# Altium PCB PCB1.PcbDoc (part 2 of 2)
Units mm, origin at the board's own origin, x right, y up, seen from the top; angles counter-clockwise.
Board outline 126 x 133 mm, 6 copper layers (Top Layer, GND Layer, Signal Layer 1, Signal Layer 2, VCC Layer, Bottom Layer), stack 0.887 mm thick; 217 components, 126 nets, 563 pads, 129 vias.
Unrouted connection lines stored in the file: 18.
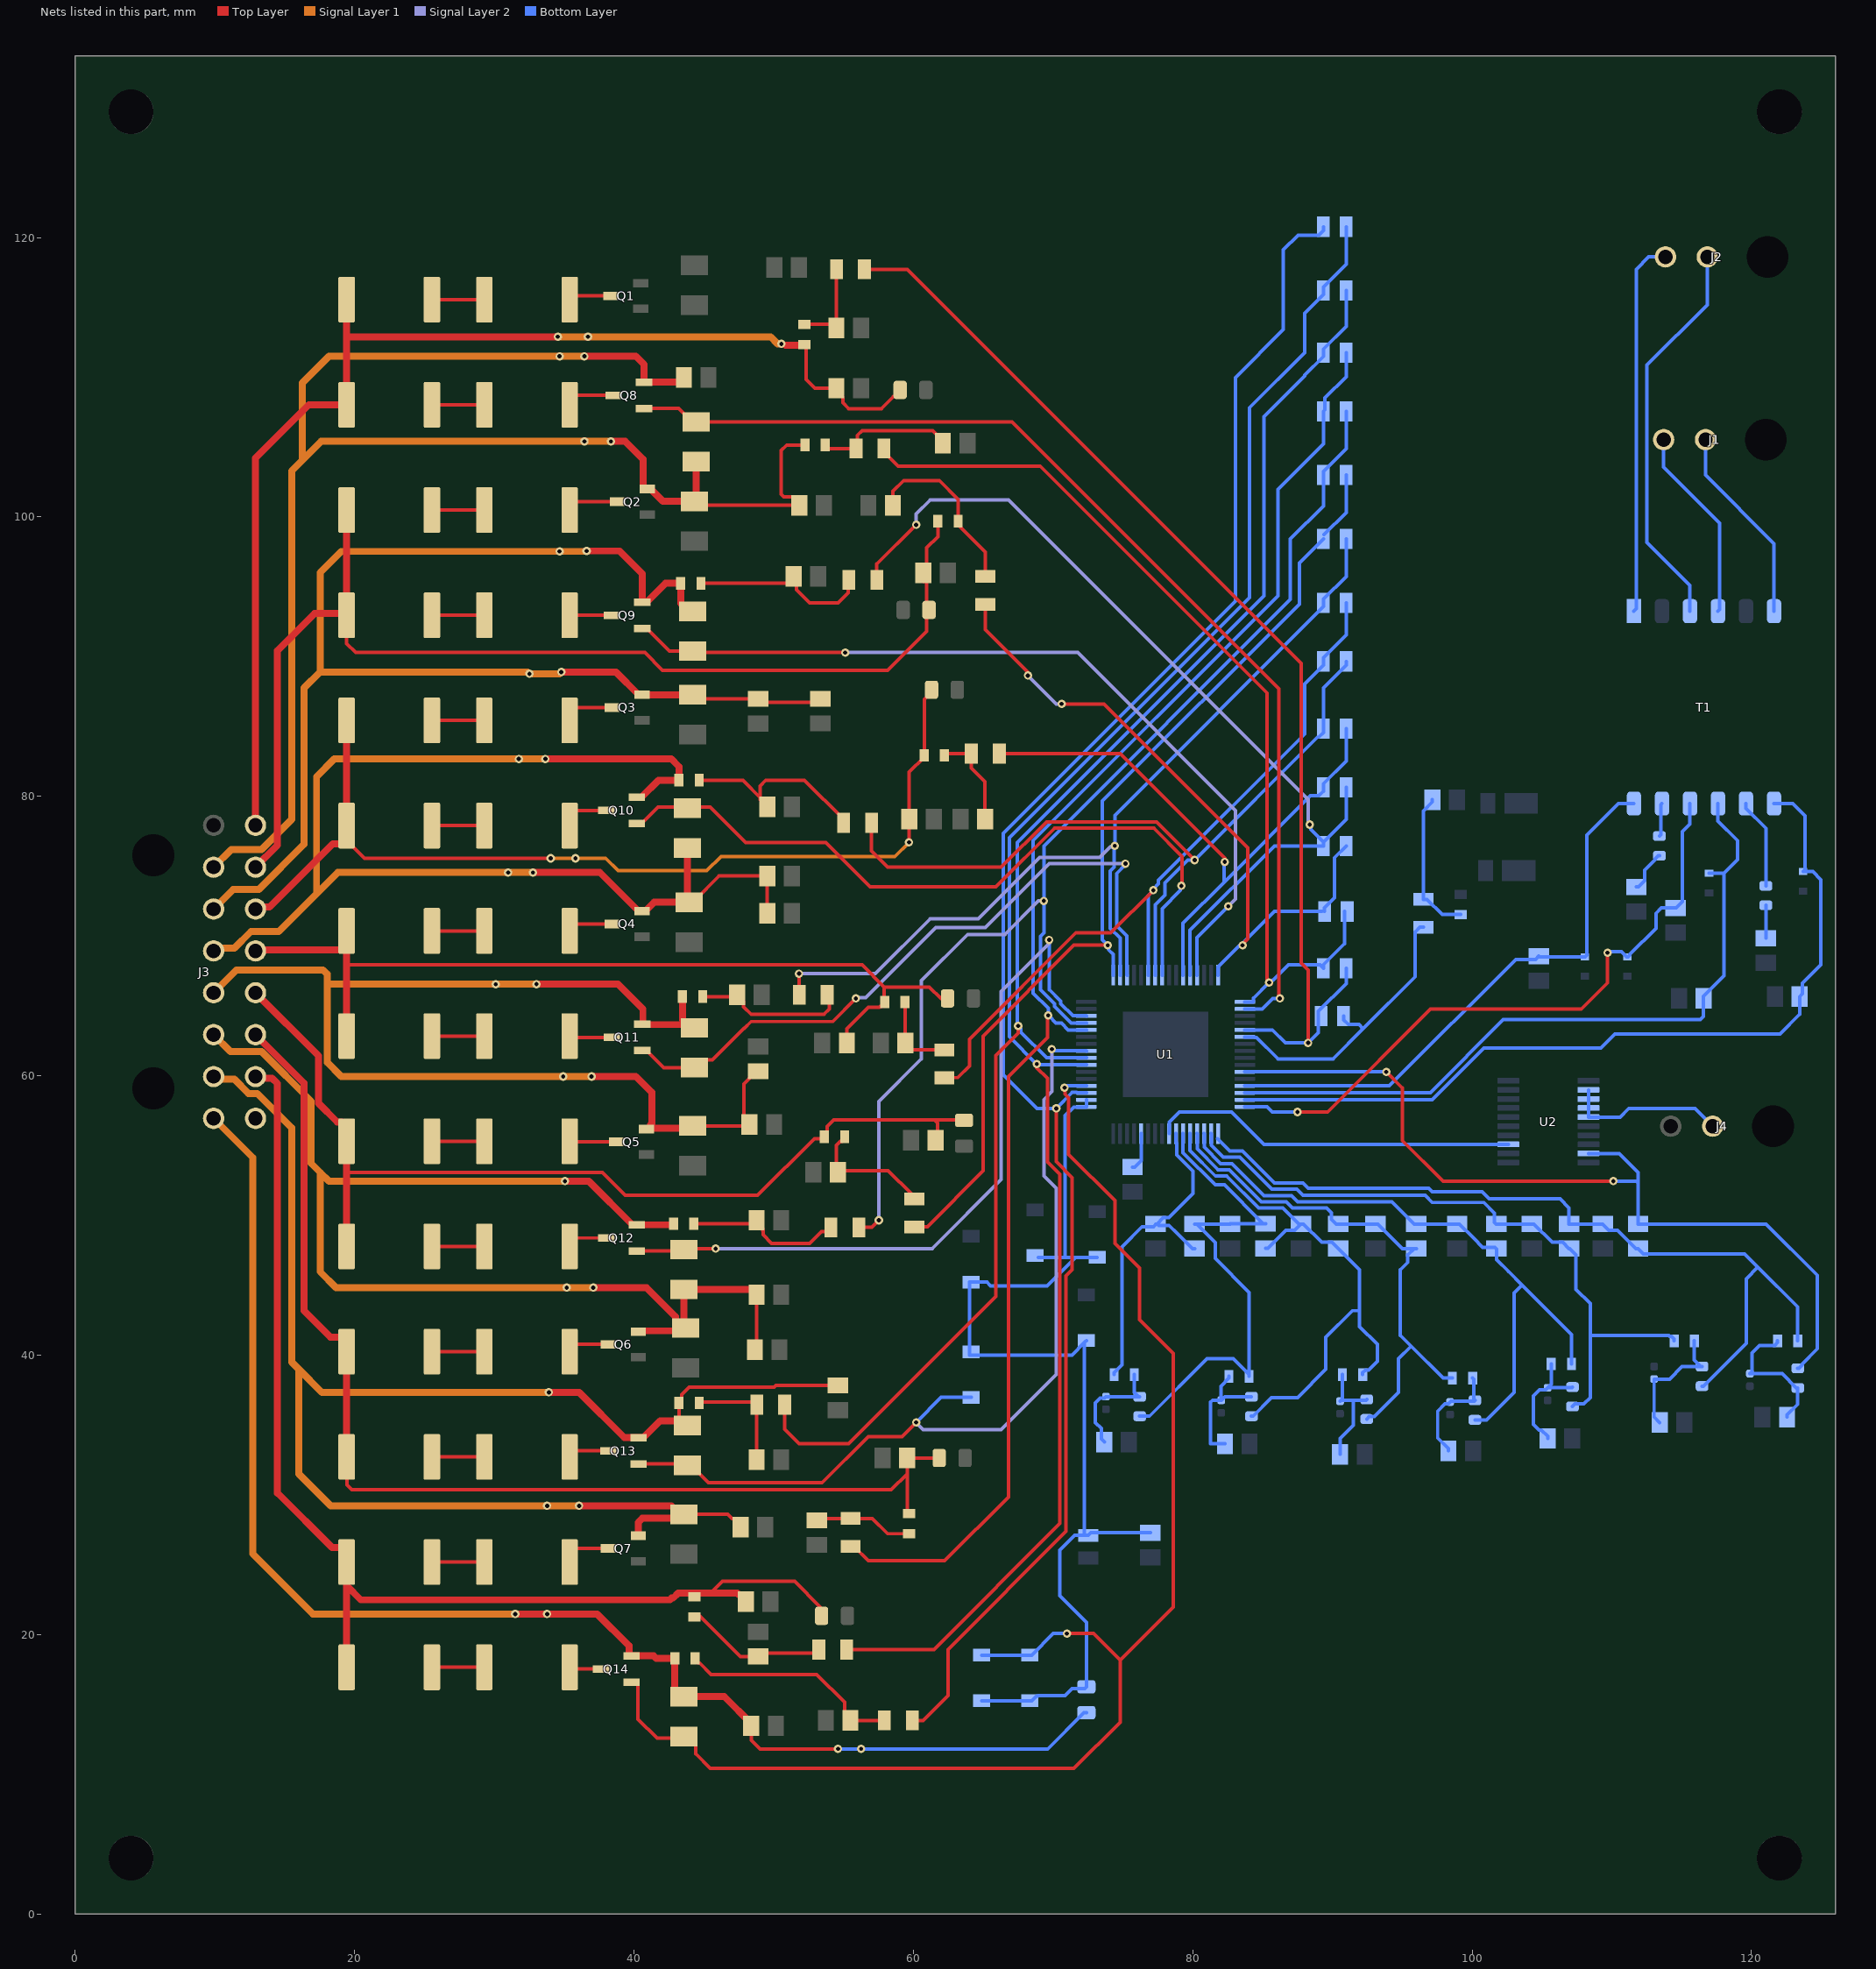
[diagram p6: the nets of this part, all layers, seen from the top]

## Via types
v1: diameter 0.6, hole 0.3, Top Layer to Bottom Layer, 129 vias

## Nets (pads, with @x,y where several pads share a name; then routed paths per layer and width w, separated by ;. In a path a pad name is that pad's centre, name@x,y a point inside that pad or via, vN(x,y) a via of type N, cw(c..) or ccw(c..) an arc to the next point about the centre after c; other vN are vias at no path point) (continued)
CB_TOP1: D6.2 D9.2 Q14.1 R97.2 U1.4 | length 104.1
  Top Layer w0.25: Q14.1@39.827,16.586 40.145,16.586 40.286,16.445 40.286,13.943 41.656,12.573 43.434,12.573 R97.2@43.561,12.7 43.836,12.7 44.411,12.125 44.411,11.469 45.466,10.414 71.501,10.414 74.803,13.716 74.803,18.161 ; v1(70.821,59.146) 70.866,59.101 70.866,58.674 71.12,58.42 71.12,54.356 74.422,51.054 74.422,48.006 76.2,46.228 76.2,42.545 78.613,40.132 78.613,21.971 74.803,18.161 ; v1(70.993,20.066) 72.898,20.066 74.803,18.161
  Bottom Layer w0.25: D9.2@64.897,18.526 D6.2@68.326,18.526 68.481,18.526 70.021,20.066 v1(70.993,20.066) ; v1(70.821,59.146) 70.974,59.299 72.369,59.299 U1.4@72.39,59.278
CB_TOP2: D11.2 Q13.1 R86.2 U1.9 | length 65.2
  Top Layer w0.25: Q13.1@40.335,32.207 43.711,32.207 R86.2@43.815,32.103 44.09,32.103 45.332,30.861 53.467,30.861 56.769,34.163 59.182,34.163 v1(60.198,35.179)
  Signal Layer 2 w0.25: v1(60.198,35.179) 60.706,34.671 66.294,34.671 70.231,38.608 70.231,51.943 69.342,52.832 69.342,58.288 69.927,58.873 69.927,61.894 v1(69.912,61.909)
  Bottom Layer w0.25: v1(60.198,35.179) 61.992,36.973 D11.2@64.135,36.973 ; v1(69.912,61.909) 70.028,61.793 72.375,61.793 U1.9@72.39,61.778
CB_TOP3: Q12.1 R75.2 U1.14 | length 53.9
  Top Layer w0.25: Q12.1@40.208,47.447 43.454,47.447 R75.2@43.561,47.554 43.632,47.625 v1(45.847,47.625)
  Signal Layer 2 w0.25: v1(45.847,47.625) 61.341,47.625 66.294,52.578 66.294,66.04 69.723,69.469 v1(69.723,69.723)
  Bottom Layer w0.25: v1(69.723,69.723) 69.723,66.17 70.557,65.336 70.557,65.161 71.424,64.293 72.375,64.293 U1.14@72.39,64.278
CB_TOP4: Q11.1 R64.2 U1.19 | length 49.7
  Top Layer w0.25: Q11.1@40.589,61.798 40.907,61.798 42.126,60.579 R64.2@44.323,60.579 44.889,61.145 45.619,61.145 47.86,63.385 47.891,63.385 48.387,63.881 54.229,63.881 v1(55.88,65.532)
  Signal Layer 2 w0.25: v1(55.88,65.532) 55.947,65.599 56.582,65.599 61.595,70.612 65.151,70.612 69.723,75.184 v1(75.184,75.184)
  Bottom Layer w0.25: v1(75.184,75.184) 75.184,75.117 74.549,74.482 74.549,70.74 75.275,70.014 75.275,67.911 75.295,67.891 75.295,67.213 U1.19@75.31,67.198
CB_TOP5: Q10.1 R53.2 U1.24 | length 53.6
  Top Layer w0.25: Q10.1@40.208,78.054 40.526,78.054 41.719,79.248 43.815,79.248 45.466,79.248 48.006,76.708 53.721,76.708 56.896,73.533 65.913,73.533 70.094,77.714 77.226,77.714 79.248,75.692 79.248,73.655 v1(79.187,73.594)
  Bottom Layer w0.25: U1.24@77.81,67.198 77.81,71.968 79.12,73.278 79.12,73.527 v1(79.187,73.594)
CB_TOP6: Q9.1 R42.2 U1.29 | length 60.8
  Top Layer w0.25: Q9.1@40.589,92.024 40.907,92.024 42.535,90.396 R42.2@44.196,90.396 44.295,90.297 v1(55.118,90.297)
  Signal Layer 2 w0.25: v1(55.118,90.297) 71.755,90.297 83.058,78.994 83.058,72.644 v1(82.55,72.136)
  Bottom Layer w0.25: U1.29@80.31,67.198 80.31,69.896 v1(82.55,72.136)
CB_TOP7: Q8.1 R31.2 U1.34 | length 78.8
  Top Layer w0.25: Q8.1@40.716,107.772 43.21,107.772 44.175,106.807 R31.2@44.45,106.807 67.056,106.807 86.174,87.689 86.174,65.591 v1(86.233,65.532)
  Bottom Layer w0.25: U1.34@83.73,64.778 84.971,64.778 85.725,65.532 v1(86.233,65.532)
CELL_IN_BOT2: C46.1 C55.1 J3.7 pad.2 Q2.2 Q8.2 R28.1 R31.1 R48.1 | length 117.4
  Top Layer w0.25: R48.1@44.323,101.12 44.605,100.838 C55.1@51.834,100.838 51.834,100.998 51.384,101.448 50.717,101.448 50.546,101.619 50.546,104.775 50.927,105.156 R28.1@52.234,105.156
  Top Layer w0.5: J3.7@9.906,74.93 J3.7@10.102,75.126 ; v1(36.449,111.506) 40.132,111.506 40.716,110.922 Q8.2@40.716,109.652 43.245,109.652 43.57,109.977 C46.1@43.57,109.982 ; v1(38.354,105.41) 39.37,105.41 40.653,104.127 40.653,102.062 40.708,102.007 41.188,102.007 42.075,101.12 R48.1@44.323,101.12 44.45,101.247 R31.1@44.45,103.957
  Signal Layer 1 w0.5: J3.7@9.906,74.93 11.176,76.2 13.335,76.2 15.494,78.359 15.494,103.301 16.256,104.063 ; v1(36.449,111.506) v1(34.671,111.506) 18.161,111.506 16.256,109.601 16.256,104.063 ; v1(38.354,105.41) pad.2@36.449,105.41 17.603,105.41 16.256,104.063
CELL_IN_BOT3: C51.1 C60.1 J3.6 Q3.2 Q9.2 R39.1 R42.1 R59.1 | length 97.5
  Top Layer w0.25: R59.1@44.196,87.277 44.494,86.977 C51.1@48.895,86.977 49.14,86.732 C60.1@53.467,86.732
  Top Layer w0.5: v1(34.798,88.9) 38.702,88.9 40.327,87.275 Q3.2@40.567,87.275 40.568,87.276 R59.1@44.196,87.277 ; v1(36.608,97.568) 38.957,97.568 40.589,95.936 Q9.2@40.589,93.904 40.907,93.904 42.253,95.25 R39.1@43.344,95.25 43.344,93.823 43.921,93.246 R42.1@44.196,93.246
  Signal Layer 1 w0.5: J3.6@9.906,71.933 11.312,73.339 13.141,73.339 16.383,76.581 16.383,87.757 17.526,88.9 ; v1(34.798,88.9) 34.671,88.773 v1(32.512,88.773) 32.385,88.9 17.526,88.9 ; v1(36.608,97.568) 36.576,97.536 v1(34.671,97.536) 19.05,97.536 17.526,96.012 17.526,88.9
CELL_IN_BOT4: C56.1 C65.1 J3.5 Q4.2 Q10.2 R50.1 R53.1 R70.1 | length 90.9
  Top Layer w0.25: R70.1@43.815,72.545 44.344,72.545 46.094,74.295 C56.1@49.539,74.295 49.539,71.628 C65.1@49.179,71.268
  Top Layer w0.5: v1(32.766,74.549) 37.559,74.549 40.327,71.781 Q4.2@40.567,71.781 40.807,71.781 41.444,72.418 R70.1@43.942,72.418 43.815,72.545 R53.1@43.815,76.299 ; v1(33.655,82.677) 42.672,82.677 43.217,82.132 R50.1@43.217,81.153 41.745,81.153 40.526,79.934 Q10.2@40.208,79.934
  Signal Layer 1 w0.5: J3.5@9.906,68.936 10.102,69.132 11.385,69.132 12.569,70.316 14.563,70.316 17.272,73.025 ; v1(32.766,74.549) 18.796,74.549 17.272,73.025 ; v1(33.655,82.677) v1(31.75,82.677) 18.542,82.677 17.272,81.407 17.272,73.025
  other v1: 30.988,74.549
CELL_IN_BOT5: C61.1 C70.1 J3.4 Q5.2 Q11.2 R61.1 R64.1 R81.1 | length 84.2
  Top Layer w0.25: R81.1@44.021,56.241 44.168,56.388 C70.1@48.142,56.388 ; C70.1@48.269,56.515 47.879,56.905 47.879,59.402 48.285,59.808 48.285,59.875 48.735,60.325 C61.1@48.895,60.325
  Top Layer w0.5: v1(33.02,66.558) 38.852,66.558 40.64,64.77 40.64,63.695 40.623,63.678 Q11.2@40.589,63.678 40.606,63.661 R64.1@43.816,63.661 ; v1(36.957,59.944) 40.132,59.944 41.275,58.801 41.275,56.567 41.189,56.481 Q5.2@41.189,56.241 ; Q5.2@40.894,56.186 41.134,56.186 Q5.2@41.189,56.241 ; R61.1@43.471,65.659 43.471,64.006 R64.1@43.816,63.661 ; R81.1@44.021,56.241 Q5.2@41.189,56.241 ; R64.1@44.323,63.429 44.048,63.429 R64.1@43.816,63.661
  Signal Layer 1 w0.5: J3.4@9.906,65.938 11.532,67.564 17.741,67.564 18.034,67.271 18.034,66.558 ; v1(33.02,66.558) 30.109,66.558 v1(30.099,66.548) 18.044,66.548 18.034,66.558 ; v1(36.957,59.944) v1(34.925,59.944) 19.05,59.944 18.034,60.96 18.034,66.558
CELL_IN_BOT6: C66.1 C75.1 J3.3 Q6.2 Q12.2 R72.1 R75.1 R92.1 | length 91.9
  Top Layer w0.25: C75.1@48.65,40.386 48.777,40.513 C66.1@48.777,44.323
  Top Layer w0.5: v1(35.052,52.451) 36.767,52.451 39.891,49.327 Q12.2@40.208,49.327 42.761,49.327 R72.1@42.836,49.403 ; v1(37.084,44.831) 40.894,44.831 42.963,42.762 42.963,42.388 43.413,41.938 R92.1@43.688,41.938 43.434,41.938 43.233,41.737 40.368,41.737 Q6.2@40.313,41.682 ; R92.1@43.561,42.065 R75.1@43.561,44.704 48.452,44.704 48.777,44.379 C66.1@48.777,44.323
  Signal Layer 1 w0.5: J3.3@9.906,62.941 11.118,61.729 13.328,61.729 16.891,58.166 16.891,53.721 17.526,53.086 ; v1(35.052,52.451) 18.161,52.451 17.526,53.086 ; v1(37.084,44.831) v1(35.179,44.831) 18.669,44.831 17.526,45.974 17.526,53.086
CELL_IN_BOT7: C71.1 C80.1 J3.2 Q7.2 Q13.2 R83.1 R86.1 R103.1 | length 113.5
  Top Layer w0.25: R86.1@43.439,35.306 43.217,35.528 R83.1@43.217,36.576 43.411,36.77 43.411,37.188 43.942,37.719 50.038,37.719 50.165,37.846 54.238,37.846 C71.1@54.61,38.218 ; R103.1@43.561,28.603 46.717,28.603 47.024,28.296 47.184,28.296 47.634,27.846 C80.1@47.634,27.686
  Top Layer w0.5: v1(33.909,37.338) 36.068,37.338 39.319,34.087 Q13.2@40.335,34.087 40.653,34.087 41.872,35.306 43.217,35.306 R86.1@43.439,35.306 ; v1(36.068,29.21) 42.679,29.21 43.286,28.603 R103.1@43.561,28.603 43.279,28.321 40.606,28.321 40.313,28.028 Q7.2@40.313,27.077
  Signal Layer 1 w0.5: J3.2@9.906,59.944 10.102,59.748 11.385,59.748 12.401,58.732 13.023,58.732 15.494,56.261 15.494,39.497 16.002,38.989 ; v1(33.909,37.338) 17.653,37.338 16.002,38.989 ; v1(36.068,29.21) v1(33.782,29.21) 18.288,29.21 16.002,31.496 16.002,38.989
CELL_IN_MID1: C48.1 J3.16 R30.2 R32.1 R33.1 R35.1 | length 86
  Top Layer w0.25: v1(50.546,112.395) 50.636,112.305 50.837,112.305 ; R33.1@52.161,112.305 52.324,112.142 52.324,109.855 52.959,109.22 C48.1@54.492,109.22 54.492,109.06 54.942,108.61 54.942,108.474 54.952,108.464 54.952,108.185 55.377,107.76 57.722,107.76 58.57,108.608 58.71,108.608 59.055,108.953 R32.1@59.055,109.093
  Top Layer w0.5: J3.16@12.903,77.927 12.903,104.216 16.714,108.027 R30.2@19.424,108.027 19.424,112.903 ; R35.1@19.424,115.558 19.424,112.903 ; v1(34.544,112.903) 19.424,112.903 ; 50.837,112.305 R33.1@52.16,112.305
  Signal Layer 1 w0.5: v1(34.544,112.903) v1(36.703,112.903) 49.784,112.903 50.292,112.395 v1(50.546,112.395)
CELL_IN_MID2: C53.1 J3.15 R41.1 R43.1 R44.1 R46.1 | length 83.1
  Top Layer w0.25: R41.1@19.424,92.965 19.424,90.939 20.066,90.297 40.767,90.297 42.037,89.027 58.166,89.027 60.96,91.821 60.96,93.182 R43.1@61.123,93.345 60.951,93.517 60.951,95.275 60.849,95.377 C53.1@60.697,95.377 ; C53.1@60.833,95.885 60.96,96.012 60.96,97.79 61.759,98.589 R44.1@61.759,99.568
  Top Layer w0.5: J3.15@12.903,74.93 14.478,76.505 14.478,90.424 17.145,93.091 R41.1@19.298,93.091 ; R41.1@19.424,92.965 19.431,92.972 19.431,100.489 R46.1@19.424,100.496
CELL_IN_MID3: C58.1 J3.14 R52.1 R54.1 R55.1 R57.1 | length 70.8
  Top Layer w0.25: R52.1@19.424,76.94 19.424,76.852 20.711,75.565 v1(34.036,75.565) ; v1(59.69,76.708) 59.708,76.726 C58.1@59.708,78.359 59.708,81.734 60.78,82.806 R55.1@60.78,82.931 60.78,86.959 61.305,87.484 R54.1@61.305,87.63
  Top Layer w0.5: J3.14@12.903,71.933 13.04,72.07 13.904,72.07 18.439,76.605 19.089,76.605 19.424,76.94 R52.1@19.424,77.902 R57.1@19.424,85.434
  Signal Layer 1 w0.25: v1(34.036,75.565) v1(35.814,75.565) 37.973,75.565 38.862,74.676 45.212,74.676 46.228,75.692 58.674,75.692 v1(59.69,76.708)
CELL_IN_MID4: C63.1 J3.13 R63.1 R65.1 R66.1 R68.1 | length 64.2
  Top Layer w0.25: 19.424,68.065 19.544,67.945 56.325,67.945 57.912,66.358 ; C63.1@55.236,62.357 55.236,63.364 56.769,64.897 57.568,64.897 57.624,64.953 57.749,64.953 57.949,65.153 R66.1@57.949,65.278 57.912,65.315 57.912,66.358 ; R65.1@62.702,65.532 61.976,65.532 61.151,66.358 57.912,66.358
  Top Layer w0.5: J3.13@12.903,68.936 12.972,69.005 19.089,69.005 R68.1@19.424,69.34 ; R63.1@19.424,62.84 19.424,67.818 19.424,68.065 R68.1@19.424,69.34 ; R68.1@19.424,70.371 R68.1@19.424,69.34
CELL_IN_MID5: C68.1 J3.12 R74.1 R76.1 R77.1 R79.1 | length 70.1
  Top Layer w0.25: 19.424,52.959 19.541,53.076 37.729,53.076 39.37,51.435 48.855,51.435 52.91,55.49 53.431,55.49 53.831,55.89 53.831,56.371 54.292,56.832 58.951,56.832 61.594,56.832 ; C68.1@61.586,55.372 61.722,55.508 61.722,56.632 61.594,56.76 61.594,56.832 ; R76.1@63.627,56.805 63.6,56.832 61.594,56.832
  Top Layer w0.5: J3.12@12.903,65.938 17.408,61.433 17.408,58.032 18.746,56.694 19.089,56.694 19.424,56.359 R79.1@19.424,55.309 19.424,52.959 R74.1@19.424,47.778
CELL_IN_MID6: C73.1 J3.11 R85.1 R87.1 R88.1 R90.1 | length 82.5
  Top Layer w0.25: R85.1@19.424,32.715 19.45,32.689 19.45,30.715 19.812,30.353 58.42,30.353 59.554,31.487 ; R88.1@59.69,28.665 59.554,28.801 59.554,31.487 ; R87.1@61.849,32.639 C73.1@59.554,32.639 59.554,32.479 59.554,31.487
  Top Layer w0.5: J3.11@12.903,62.941 16.383,59.461 16.383,43.18 18.274,41.289 19.089,41.289 19.424,40.954 R90.1@19.424,40.247 R85.1@19.424,32.715
CELL_IN_MID7: C78.1 J3.10 R96.1 R98.1 R99.1 R101.1 | length 84.9
  Top Layer w0.25: 45.466,22.965 45.488,22.987 45.561,23.06 45.574,23.06 46.325,23.812 51.499,23.812 53.34,21.971 R98.1@53.34,21.427
  Top Layer w0.5: J3.10@12.903,59.944 13.03,59.817 14.097,59.817 14.478,59.436 14.478,30.13 18.382,26.226 19.089,26.226 19.424,25.891 R101.1@19.424,25.184 19.424,23.495 ; R96.1@19.424,17.653 19.424,23.495 ; C78.1@48.015,22.733 47.911,22.837 47.514,22.837 47.386,22.965 45.466,22.965 43.158,22.965 42.799,22.606 42.702,22.606 42.575,22.479 20.447,22.479 19.431,23.495 19.424,23.495
CELL_IN_TOP7: C76.1 J3.1 Q14.2 R2.1 R94.1 R97.1 | length 101.4
  Top Layer w0.25: C76.1@48.396,13.462 48.396,12.437 49.022,11.811 v1(54.61,11.811)
  Top Layer w0.5: v1(31.496,21.463) v1(33.782,21.463) 37.369,21.463 39.643,19.19 39.643,18.483 Q14.2@39.878,18.483 ; Q14.2@39.827,18.466 41.409,18.466 41.587,18.288 R94.1@42.926,18.288 42.926,16 43.376,15.55 46.468,15.55 48.396,13.622 C76.1@48.396,13.462
  Signal Layer 1 w0.5: J3.1@9.906,56.947 12.7,54.153 12.7,25.781 17.018,21.463 v1(31.496,21.463)
  Bottom Layer w0.25: v1(54.61,11.811) v1(56.261,11.811) 69.62,11.811 72.215,14.406 R2.1@72.39,14.406
CT_BOT1: C6.1 C9.2 R100.2 U1.7 | length 126.9
  Top Layer w0.25: R100.2@55.229,18.923 61.468,18.923 70.485,27.94 70.485,52.958 69.606,53.837 69.606,59.807 68.834,60.579 v1(68.834,60.833)
  Bottom Layer w0.25: U1.7@72.39,60.778 72.375,60.793 68.874,60.793 v1(68.834,60.833) 66.88,62.787 66.88,77.04 84.074,94.234 84.074,107.823 88.011,111.76 88.011,114.592 89.357,115.938 C9.2@89.357,116.205 89.357,116.472 90.983,118.097 C6.1@90.983,120.777
CT_BOT2: C11.1 C12.2 R89.2 U1.12 | length 109.5
  Top Layer w0.25: R89.2@55.499,26.305 55.749,26.305 56.781,25.273 62.23,25.273 66.802,29.845 66.802,59.944 69.596,62.738 69.596,64.262 v1(69.657,64.323)
  Bottom Layer w0.25: v1(69.657,64.323) 69.657,64.836 68.58,65.913 68.58,76.835 86.106,94.361 86.106,101.981 89.357,105.232 C12.2@89.357,107.569 89.471,107.683 89.471,108.521 90.983,110.033 C11.1@90.983,111.76 ; v1@69.718,64.262 70.213,63.767 70.602,63.767 71.091,63.278 U1.12@72.39,63.278
CT_BOT3: C13.1 C14.2 R78.2 U1.17 | length 70.8
  Top Layer w0.25: R78.2@60.105,49.199 61.01,49.199 65.002,53.191 65.002,62.844 71.5,69.342 v1(73.914,69.342)
  Bottom Layer w0.25: U1.17@74.31,67.198 74.31,68.692 73.981,69.021 73.981,69.275 73.533,69.723 73.533,79.67 87.63,93.767 87.63,96.698 C14.2@89.357,98.425 ; C14.2@89.408,98.742 90.983,100.317 C13.1@90.983,102.997
CT_BOT4: C15.1 C16.2 R67.2 U1.22 | length 53.9
  Top Layer w0.25: R67.2@62.484,59.849 62.502,59.867 63.169,59.867 64.008,60.706 64.008,62.611 71.628,70.231 74.135,70.231 v1(77.183,73.279)
  Bottom Layer w0.25: U1.22@76.81,67.198 76.81,72.906 v1(77.183,73.279) 77.183,73.374 77.555,73.745 77.555,74 88.011,84.456 88.011,88.049 89.357,89.395 C16.2@89.357,89.662 89.357,89.929 90.983,91.554 C15.1@90.983,93.853
CT_BOT5: C17.1 C18.2 R56.2 U1.27 | length 43.8
  Top Layer w0.25: R56.2@66.151,83.058 74.803,83.058 82.296,75.565 v1(82.296,75.311)
  Bottom Layer w0.25: U1.27@79.31,67.198 79.31,70.928 82.233,73.85 ; v1(82.296,75.311) 82.233,75.248 82.233,73.85 ; C17.1@90.983,84.836 90.983,82.537 89.357,80.912 C18.2@89.357,80.645 89.357,80.378 89.025,80.046 88.428,80.046 82.233,73.85
CT_BOT6: C21.1 C26.2 R45.2 U1.32 | length 49.5
  Top Layer w0.25: R45.2@65.151,93.742 65.151,91.948 68.199,88.9 v1(68.199,88.646) ; v1(70.612,86.614) 73.66,86.614 83.947,76.327 83.947,69.79 83.566,69.409 v1(83.566,69.342)
  Signal Layer 2 w0.25: v1(68.199,88.646) 70.231,86.614 v1(70.612,86.614)
  Bottom Layer w0.25: U1.32@81.81,67.198 81.81,67.793 83.399,69.382 83.526,69.382 v1(83.566,69.342) 83.566,69.437 83.73,69.601 83.73,69.633 85.852,71.755 C26.2@89.23,71.755 ; C26.2@89.433,71.755 89.433,72.022 90.139,72.728 90.139,75.611 C21.1@90.983,76.454
CT_BOT7: C28.1 C30.2 R34.2 U1.37 | length 81.7
  Top Layer w0.25: R34.2@56.499,117.729 59.563,117.729 87.757,89.535 87.757,68.072 88.265,67.564 v1(88.265,62.357)
  Bottom Layer w0.25: U1.37@83.73,63.278 85.71,63.278 86.631,62.357 v1(88.265,62.357) 88.998,63.09 88.998,64.607 90.983,66.592 C28.1@90.983,67.691
CT_REF: C30.1 R23.2 U1.38 | length 21.1
  Bottom Layer w0.25: U1.38@83.73,62.778 83.745,62.763 84.423,62.763 84.443,62.743 84.579,62.743 86.108,61.214 90.043,61.214 92.202,63.373 ; C30.1@90.805,64.262 90.805,63.995 91.137,63.663 91.912,63.663 92.202,63.373 ; R23.2@96.52,70.628 96.27,70.628 95.935,70.293 95.935,67.106 92.202,63.373
CT_TOP1: C6.2 R95.2 U1.3 | length 128
  Top Layer w0.25: R95.2@59.928,13.843 60.706,13.843 62.484,15.621 62.484,18.923 70.935,27.374 70.935,45.662 71.374,46.101 71.374,52.705 70.231,53.848 v1(70.231,57.658)
  Bottom Layer w0.25: U1.3@72.39,58.778 72.375,58.793 71.697,58.793 71.689,58.801 71.374,58.801 v1(70.231,57.658) 68.839,57.658 66.43,60.067 66.43,77.352 83.058,93.98 83.058,109.982 86.487,113.411 86.487,119.126 87.539,120.178 89.025,120.178 89.357,120.51 C6.2@89.357,120.777
CT_TOP2: C9.1 C11.2 R84.2 U1.8 | length 110.2
  Top Layer w0.25: R84.2@50.784,36.449 50.784,34.687 51.816,33.655 55.372,33.655 65.902,44.185 65.902,61.457 67.505,63.06 v1(67.505,63.564)
  Bottom Layer w0.25: v1@67.691,63.378 67.691,63.124 69.531,61.284 72.384,61.284 U1.8@72.39,61.278 ; v1@67.696,63.373 v1(67.505,63.564) 67.546,63.564 67.573,63.591 67.437,63.727 67.437,76.708 85.09,94.361 85.09,107.188 88.011,110.109 88.011,110.147 89.357,111.493 C11.2@89.357,111.76 89.357,112.027 90.983,113.652 C9.1@90.983,116.205
CT_TOP3: C12.1 C13.2 R73.2 U1.13 | length 86
  Top Layer w0.25: R73.2@56.102,49.149 57.023,49.149 v1(57.531,49.657)
  Signal Layer 2 w0.25: v1(57.531,49.657) 57.531,58.166 60.579,61.214 60.579,66.802 63.881,70.104 66.548,70.104 68.961,72.517 v1(69.342,72.517)
  Bottom Layer w0.25: U1.13@72.39,63.778 71.303,63.778 70.107,64.974 70.107,65.149 69.098,66.158 69.098,69.982 69.342,70.226 69.342,76.454 86.995,94.107 86.995,98.425 89.357,100.787 C13.2@89.357,102.997 89.357,103.264 90.983,104.889 C12.1@90.983,107.569
CT_TOP4: C14.1 C15.2 R62.2 U1.18 | length 66.4
  Top Layer w0.25: v1(51.816,67.31) 51.816,67.183 51.832,67.167 R62.2@51.832,65.786
  Signal Layer 2 w0.25: v1(51.816,67.31) 57.277,67.31 61.214,71.247 64.643,71.247 69.03,75.634 73.348,75.634 74.101,76.387 74.355,76.387 v1(74.422,76.454)
  Bottom Layer w0.25: U1.18@74.81,67.198 74.803,67.205 74.803,69.85 74.099,70.554 74.099,74.668 74.362,74.931 74.362,76.034 74.375,76.047 74.375,76.407 v1(74.422,76.454) 74.422,78.651 89.357,93.586 C15.2@89.357,93.853 89.357,94.12 90.983,95.745 C14.1@90.983,98.425
CT_TOP5: C16.1 C17.2 R51.2 U1.23 | length 56.6
  Top Layer w0.25: R51.2@57.007,78.105 57.007,76.089 58.166,74.93 66.294,74.93 69.528,78.164 77.412,78.164 80.137,75.439 v1(80.137,75.438)
  Bottom Layer w0.25: U1.23@77.31,67.198 77.31,72.23 78.005,72.925 78.005,73.814 79.629,75.438 v1(80.137,75.438) ; v1(80.137,75.438) 88.935,84.237 89.025,84.237 89.357,84.569 89.357,87.77 90.983,89.395 C16.1@90.983,89.662
CT_TOP6: C18.1 C21.2 R40.2 U1.28 | length 66.6
  Top Layer w0.25: R40.2@57.388,95.504 57.388,96.631 v1(60.198,99.441)
  Signal Layer 2 w0.25: v1(60.198,99.441) 60.198,100.203 61.214,101.219 66.802,101.219 88.265,79.756 v1@88.265,78.19
  Bottom Layer w0.25: U1.28@79.81,67.198 79.81,70.412 85.852,76.454 C21.2@89.357,76.454 C21.2@89.357,76.721 ; v1(88.382,77.978) 88.449,77.911 88.449,77.629 C21.2@89.357,76.721 ; C18.1@90.983,80.645 90.983,78.346 C21.2@89.357,76.721
CT_TOP7: C26.1 C28.2 R29.2 U1.33 | length 67.6
  Top Layer w0.25: R29.2@57.896,104.902 57.896,104.652 58.916,103.632 69.088,103.632 85.334,87.386 85.334,66.812 85.598,66.548 v1(85.471,66.675)
  Bottom Layer w0.25: U1.33@83.73,65.278 84.325,65.278 84.34,65.293 84.34,65.544 v1(85.471,66.675) 85.566,66.675 85.73,66.839 85.762,66.839 86.868,67.945 89.103,67.945 C28.2@89.357,67.691 89.357,67.958 90.856,69.456 C26.1@90.856,71.755
GPIO_0: C19.1 C22.2 C31.2 R6.1 R11.2 U1.49 | length 59.9
  Bottom Layer w0.25: U1.49@81.775,55.499 82.664,54.61 83.566,54.61 85.852,52.324 87.884,52.324 88.265,51.943 96.901,51.943 97.155,51.689 100.712,51.689 101.22,51.181 106.299,51.181 106.934,50.546 C31.2@106.934,49.385 C22.2@109.347,49.385 109.797,48.935 110.417,48.935 111.727,47.625 C19.1@111.887,47.625 112.268,47.244 119.507,47.244 120.459,46.291 ; R11.2@116.459,37.781 116.559,37.781 119.634,40.856 119.634,45.466 120.459,46.291 ; R6.1@123.317,41.021 123.317,43.434 120.459,46.291
GPIO_1: C31.1 C34.2 C36.2 R13.1 R16.2 U1.50 | length 49
  Bottom Layer w0.25: U1.50@81.31,55.858 81.325,55.843 81.325,55.029 82.194,54.16 83.38,54.16 85.666,51.874 87.456,51.874 87.895,51.435 96.647,51.435 97.155,50.927 100.838,50.927 101.6,50.165 101.6,49.512 C36.2@101.727,49.385 C34.2@104.267,49.385 104.427,49.385 105.737,48.075 106.484,48.075 C31.1@106.934,47.625 106.992,47.625 107.442,47.175 107.442,44.704 108.458,43.688 108.458,41.402 ; R16.2@107.188,36.319 107.376,36.507 108.008,36.507 108.458,36.957 108.458,41.402 ; R13.1@114.464,41.021 114.464,41.146 114.264,41.346 114.139,41.346 114.083,41.402 108.458,41.402
GPIO_2: C36.1 C38.2 C42.2 R18.1 R24.2 U1.51 | length 46.9
  Bottom Layer w0.25: U1.51@80.81,55.858 80.825,55.843 80.825,54.892 82.007,53.71 82.818,53.71 85.104,51.424 87.075,51.424 87.514,50.985 94.252,50.985 95.852,49.385 C42.2@96.012,49.385 C38.2@98.933,49.385 99.093,49.385 100.118,48.36 100.763,47.715 101.637,47.715 101.769,47.583 101.769,46.821 102.616,45.974 103.569,45.021 ; R24.2@100.203,35.368 101.027,35.368 102.997,37.338 102.997,44.45 103.569,45.021 ; R18.1@107.114,39.37 107.114,41.476 103.569,45.021
GPIO_3: C20.2 C42.1 C44.2 R5.2 R25.1 U1.52 | length 38.4
  Bottom Layer w0.25: U1.52@80.31,55.858 80.325,55.843 80.325,54.756 81.821,53.26 82.631,53.26 84.917,50.974 86.694,50.974 87.133,50.535 89.583,50.535 89.929,50.189 89.929,49.72 90.264,49.385 C44.2@93.091,49.385 93.251,49.385 95.011,47.625 C42.1@95.852,47.625 ; R5.2@92.456,35.43 92.631,35.605 93.009,35.605 94.742,37.338 94.742,39.751 95.631,40.64 ; C42.1@96.012,47.625 C42.1@95.852,47.625 ; R25.1@98.589,38.354 97.917,38.354 95.631,40.64 ; 95.631,40.64 94.869,41.402 94.869,46.101 95.402,46.634 95.402,47.175 C42.1@95.852,47.625
GPIO_4: C20.1 C24.2 C29.2 R7.1 R10.2 U1.53 | length 41
  Bottom Layer w0.25: U1.53@79.81,55.858 79.81,54.635 81.635,52.81 82.445,52.81 84.731,50.524 86.458,50.524 87.597,49.385 C24.2@87.757,49.385 ; R10.2@84.201,35.622 84.301,35.622 85.636,36.957 87.503,36.957 89.535,38.989 89.535,41.275 91.44,43.18 91.948,43.18 ; C29.2@85.217,47.643 85.377,47.643 86.669,48.935 87.307,48.935 87.677,49.305 C24.2@87.757,49.385 ; R7.1@92.165,38.608 92.165,38.733 92.365,38.933 92.607,38.933 93.218,39.544 93.218,40.767 91.948,42.037 91.948,43.18 ; C24.2@87.757,49.385 87.917,49.385 89.227,48.075 89.974,48.075 C20.1@90.424,47.625 91.948,46.101 91.948,43.18
GPIO_5: C29.1 C32.2 C37.2 R12.1 R17.2 U1.54 | length 36.7
  Bottom Layer w0.25: R17.2@76.2,35.622 76.897,35.622 81.026,39.751 82.892,39.751 R12.1@84.037,38.606 ; U1.54@79.31,55.858 79.31,54.498 81.622,52.186 82.274,52.186 84.951,49.509 C29.1@84.951,49.403 ; C37.2@80.137,49.385 C37.2@80.297,49.385 ; R12.1@84.037,38.481 R12.1@84.037,38.606 ; C29.1@85.217,49.403 C29.1@84.951,49.403 ; C37.2@80.297,49.385 C32.2@82.677,49.385 82.695,49.403 C29.1@84.951,49.403 ; C37.2@80.297,49.385 81.617,48.065 81.617,46.915 84.037,44.495 R12.1@84.037,38.606
GPIO_6: C37.1 C40.2 R19.1 U1.55 | length 24
  Bottom Layer w0.25: R19.1@74.369,38.608 74.369,38.733 74.93,39.294 74.93,47.752 76.379,49.201 77.197,49.201 77.343,49.348 C40.2@77.343,49.385 ; C40.2@77.433,49.385 77.883,49.835 78.283,49.835 80.01,51.562 80.01,53.162 78.845,54.327 78.845,55.145 78.825,55.165 78.825,55.248 78.81,55.263 U1.55@78.81,55.858 ; C40.2@77.579,49.295 78.307,49.295 78.884,48.718 79.977,47.625 C37.1@80.137,47.625
I_SENSE+: U1.56 U2.13 | length 26.4
  Bottom Layer w0.25: U1.56@78.31,55.858 78.325,55.873 78.325,56.687 79.042,57.404 82.79,57.404 85.106,55.088 U2.13@102.591,55.088
NetC2_2: C2.2 R1.1 | length 2.3
  Bottom Layer w0.25: C2.2@121.031,69.85 R1.1@121.031,72.198
NetC4_1: C4.1 C5.1 D5.1 D6.1 D7.1 D8.1 D9.1 D10.1 D11.1 R2.2 U1.1 U1.2 | length 78.5
  Bottom Layer w0.25: D9.1@64.897,15.256 68.481,15.256 68.811,15.586 68.922,15.586 68.957,15.621 70.866,15.621 71.374,16.129 72.263,16.129 R2.2@72.39,16.256 72.39,20.874 70.485,22.779 70.485,26.035 71.552,27.102 C5.1@72.25,27.102 ; D10.1@68.961,47.006 70.866,47.006 ; D5.1@72.39,41.037 72.312,40.959 D5.1@72.25,40.897 ; U1.2@72.39,58.278 U1.1@72.39,57.778 72.375,57.763 71.479,57.763 70.866,57.15 70.866,47.006 ; D8.1@73.152,47.006 73.129,46.983 71.605,46.983 ; C4.1@76.962,27.287 72.702,27.287 C5.1@72.517,27.102 C5.1@72.25,27.102 ; 70.866,47.006 70.866,46.983 71.605,46.983 ; 71.605,46.983 69.58,44.958 65.532,44.958 65.262,45.228 64.008,45.228 64.008,40.005 71.358,40.005 D5.1@72.25,40.897 ; C5.1@72.25,27.102 D5.1@72.25,40.897
NetC7_2: C7.2 D3.1 T1.10 U1.48 | length 47.2
  Top Layer w0.25: v1(87.503,57.404) 89.662,57.404 97.028,64.77 107.823,64.77 109.694,66.641 v1(109.694,68.8)
  Bottom Layer w0.25: U1.48@83.73,57.778 85.328,57.778 85.702,57.404 v1(87.503,57.404) ; v1(109.694,68.8) 109.787,68.893 110.7,68.893 111.075,68.518 D3.1@111.125,68.518 111.175,68.518 111.3,68.643 111.3,68.693 113.157,70.55 113.157,71.628 113.538,72.009 C7.2@114.554,72.009 114.612,72.009 115.062,72.459 115.062,77.47 115.599,78.007 T1.10@115.599,79.48
NetC8_2: C8.2 R3.1 | length 3.1
  Bottom Layer w0.25: C8.2@111.76,73.515 111.92,73.515 112.37,73.965 112.37,74.713 113.117,75.46 113.117,75.533 113.338,75.754 R3.1@113.411,75.754
NetC10_1: C10.1 D4.1 T1.12 U1.45 | length 41.3
  Bottom Layer w0.25: U1.45@83.73,59.278 94.076,59.278 103.124,68.326 104.539,68.326 C10.1@104.775,68.562 104.819,68.518 108.079,68.518 108.204,68.643 108.204,77.216 110.468,79.48 T1.12@111.586,79.48
NetC23_2: C23.2 R4.1 R6.2 R8.2 | length 10.1
  Bottom Layer w0.25: R6.2@121.867,41.021 121.867,40.896 121.667,40.696 120.579,40.696 120.03,40.147 120.03,38.819 R8.2@119.888,38.677 122.194,38.677 123.217,37.654 R4.1@123.317,37.654 123.317,36.491 122.546,35.72 C23.2@122.546,35.56
NetC25_2: C25.2 R5.1 R7.2 R9.2 | length 8
  Bottom Layer w0.25: C25.2@90.551,32.893 90.551,34.03 91.504,34.982 91.504,36.767 ; R9.2@90.551,36.703 90.614,36.767 90.715,36.767 91.504,36.767 ; R9.2@90.715,36.874 R7.2@90.715,38.608 ; R5.1@92.456,36.83 92.392,36.767 91.504,36.767
NetC27_1: C27.1 U1.60 | length 2.8
  Bottom Layer w0.25: C27.1@75.692,53.458 75.852,53.458 76.31,53.916 U1.60@76.31,55.858 U1.60@76.325,55.843
NetC33_2: C33.2 R10.1 R12.2 R14.2 | length 9
  Bottom Layer w0.25: C33.2@82.305,33.655 82.286,33.674 81.28,33.674 81.28,36.626 81.426,36.772 R14.2@82.042,36.772 ; R12.2@82.587,38.481 82.587,38.356 82.013,37.782 82.013,36.801 R14.2@82.042,36.772 ; R10.1@84.201,37.022 82.295,37.022 82.045,36.772 R14.2@82.042,36.772
NetC35_2: C35.2 R11.1 R13.2 R15.2 | length 9.1
  Bottom Layer w0.25: C35.2@113.429,35.179 113.03,35.578 R15.2@113.03,38.285 114.139,38.285 115.035,39.181 R11.1@116.386,39.181 ; R13.2@115.914,41.021 115.914,39.653 R11.1@116.386,39.181 ; R11.1@116.459,39.181 R11.1@116.386,39.181
NetC39_2: C39.2 R16.1 R18.2 R20.2 | length 8.4
  Bottom Layer w0.25: C39.2@105.41,34.036 105.41,34.196 104.96,34.646 104.8,34.646 104.394,35.052 104.394,37.084 104.829,37.519 105.268,37.519 R20.2@105.41,37.661 ; R18.2@105.664,39.37 105.664,37.922 105.41,37.668 R20.2@105.41,37.661 ; R16.1@107.188,37.719 107.159,37.69 105.439,37.69 R20.2@105.41,37.661
NetC41_2: C41.2 R17.1 R19.2 R21.2 | length 8.1
  Bottom Layer w0.25: C41.2@73.669,33.782 73.458,33.993 73.458,34.746 73.025,35.179 73.025,36.576 73.381,36.932 73.693,36.932 R21.2@73.787,37.026 73.789,37.024 R17.1@76.125,37.024 ; R19.2@75.819,38.608 75.819,37.33 R17.1@76.125,37.024 ; R17.1@76.2,37.022 76.198,37.024 R17.1@76.125,37.024
NetC43_2: C43.2 R22.2 R23.1 | length 10.5
  Bottom Layer w0.25: C43.2@97.155,79.756 97.155,79.596 96.52,78.961 R23.1@96.52,72.628 96.77,72.628 97.86,71.538 R22.2@99.187,71.538
NetC45_2: C45.2 R24.1 R25.2 R26.2 | length 7.8
  Bottom Layer w0.25: C45.2@98.307,33.147 98.307,33.307 97.536,34.078 97.536,35.995 98.056,36.514 98.294,36.514 98.487,36.707 100.142,36.707 R24.1@100.203,36.768 ; R25.2@100.039,38.354 100.121,38.272 R24.1@100.121,36.786
NetC47_2: C47.2 R28.2 R29.1 | length 9.9
  Top Layer w0.25: R28.2@53.684,105.156 53.684,105.102 53.884,104.902 R29.1@55.896,104.902 56.007,105.013 56.007,105.848 56.331,106.172 61.383,106.172 61.967,105.588 C47.2@62.161,105.588
NetC49_2: C49.2 R33.2 R34.1 | length 6.6
  Top Layer w0.25: R33.2@52.197,113.792 54.238,113.792 C49.2@54.492,113.538 54.499,113.545 R34.1@54.499,117.729
NetC52_2: C52.2 R39.2 R40.1 | length 13.3
  Top Layer w0.25: R39.2@44.794,95.25 50.985,95.25 51.435,95.7 C52.2@51.435,95.758 51.637,95.556 51.637,94.794 52.578,93.853 54.61,93.853 55.322,94.565 55.322,95.438 R40.1@55.388,95.504
NetC54_2: C54.2 R44.2 R45.1 | length 12.9
  Top Layer w0.25: C54.2@58.538,100.838 58.538,101.845 59.309,102.616 61.849,102.616 63.209,101.256 63.209,99.568 63.209,99.443 65.151,97.501 R45.1@65.151,95.742
NetC57_2: C57.2 R50.2 R51.1 | length 14.8
  Top Layer w0.25: R50.2@44.667,81.153 47.794,81.153 49.102,79.845 49.483,79.464 49.539,79.408 C57.2@49.539,79.248 ; C57.2@49.403,79.384 49.022,79.765 49.022,80.753 49.422,81.153 52.209,81.153 55.007,78.355 R51.1@55.007,78.105
NetC59_2: C59.2 R55.2 R56.1 | length 7.1
  Top Layer w0.25: R55.2@62.23,82.931 62.357,83.058 R56.1@64.151,83.058 64.151,82.026 65.133,81.044 C59.2@65.133,78.359
NetC62_2: C62.2 R61.2 R62.1 | length 11.2
  Top Layer w0.25: R61.2@44.921,65.659 47.262,65.659 C62.2@47.389,65.786 47.839,65.336 47.839,64.937 48.387,64.389 53.594,64.389 53.975,64.77 53.975,65.643 R62.1@53.832,65.786
NetC64_2: C64.2 R66.2 R67.1 | length 6
  Top Layer w0.25: R66.2@59.399,65.278 59.399,62.327 59.877,61.849 R67.1@62.23,61.849
NetC67_2: C67.2 R72.2 R73.1 | length 11.3
  Top Layer w0.25: R72.2@44.286,49.403 48.523,49.403 48.697,49.577 C67.2@48.777,49.657 ; C67.2@48.777,49.497 49.227,49.047 49.227,48.911 49.237,48.901 49.237,48.622 49.853,48.006 52.578,48.006 53.413,48.841 53.794,48.841 R73.1@54.102,49.149
NetC69_2: C69.2 R77.2 R78.1 | length 9.6
  Top Layer w0.25: R77.2@55.081,55.626 55.081,55.501 54.881,55.301 54.756,55.301 54.483,55.028 54.483,53.204 C69.2@54.601,53.086 54.728,53.213 58.199,53.213 59.883,51.529 59.734,51.518 59.803,51.449 R78.1@60.071,51.181
NetC72_2: C72.2 R83.2 R84.1 | length 8.1
  Top Layer w0.25: R83.2@44.667,36.832 44.867,36.632 R84.1@48.784,36.632 ; C72.2@48.777,32.512 48.784,32.519 R84.1@48.784,36.449
NetC74_2: C74.2 R88.2 R89.1 | length 7.1
  Top Layer w0.25: C74.2@53.086,28.176 53.215,28.305 57.067,28.305 58.157,27.215 R88.2@59.69,27.215
NetC77_2: C77.2 R94.2 R95.1 | length 16
  Top Layer w0.25: R94.2@44.376,18.288 44.376,18.163 44.576,17.963 44.701,17.963 45.519,17.145 53.086,17.145 55.078,15.153 55.078,14.255 C77.2@55.49,13.843 R95.1@57.928,13.843
NetC79_2: C79.2 R99.2 R100.1 | length 10.4
  Top Layer w0.25: R99.2@44.418,21.351 44.351,21.418 44.62,21.418 47.614,18.424 C79.2@48.895,18.424 49.14,18.669 52.975,18.669 R100.1@53.229,18.923
NetJ1_1: J1.1 T1.6 | length 14.3
  Bottom Layer w0.25: J1.1@116.713,105.537 116.713,102.997 121.619,98.091 T1.6@121.619,93.26
NetJ1_2: J1.2 T1.4 | length 14
  Bottom Layer w0.25: J1.2@113.716,105.537 113.716,103.581 117.729,99.568 117.729,93.383 T1.4@117.606,93.26
NetJ2_1: J2.1 T1.3 | length 28.4
  Bottom Layer w0.25: T1.3@115.599,93.26 115.599,95.094 112.522,98.171 112.522,110.871 116.84,115.189 J2.1@116.84,118.618
NetJ2_2: J2.2 T1.1 | length 27
  Bottom Layer w0.25: T1.1@111.586,93.26 111.76,93.434 111.76,117.729 112.649,118.618 J2.2@113.843,118.618
NetJ3_9: J3.9
NetJ4_1: J4.1 U2.2 U2.3 U2.4 U2.5 | length 11.6
  Bottom Layer w0.25: U2.2@108.331,58.988 U2.3@108.331,58.338 U2.4@108.331,57.688 U2.5@108.331,57.038 110.591,57.038 111.211,57.658 115.951,57.658 J4.1@117.221,56.388
NetQ1_3: Q1.3 R36.2 | length 3.1
  Top Layer w0.25: R36.2@35.392,115.558 35.657,115.824 Q1.3@38.354,115.824
NetQ2_3: Q2.3 R47.2 | length 3.7
  Top Layer w0.25: R47.2@35.392,100.496 35.392,100.632 35.852,101.092 Q2.3@38.808,101.092
NetQ3_3: Q3.3 R58.2 | length 3.7
  Top Layer w0.25: R58.2@35.392,85.434 35.392,85.9 35.852,86.36 Q3.3@38.427,86.36
NetQ4_3: Q4.3 R69.2 | length 3.3
  Top Layer w0.25: R69.2@35.392,70.371 35.392,70.406 35.852,70.866 Q4.3@38.427,70.866
NetQ5_3: Q5.3 R80.2 | length 3.4
  Top Layer w0.25: R80.2@35.392,55.309 35.429,55.271 Q5.3@38.754,55.271
NetQ6_3: Q6.3 R91.2 | length 3
  Top Layer w0.25: R91.2@35.392,40.247 35.392,40.307 35.852,40.767 Q6.3@38.173,40.767
NetQ7_3: Q7.3 R102.2 | length 3.5
  Top Layer w0.25: R102.2@35.392,25.184 35.392,25.702 35.852,26.162 Q7.3@38.173,26.162
NetQ8_3: Q8.3 R27.2 | length 3.6
  Top Layer w0.25: R27.2@35.392,108.027 35.392,108.252 35.852,108.712 Q8.3@38.532,108.712
NetQ9_3: Q9.3 R38.2 | length 3
  Top Layer w0.25: R38.2@35.392,92.965 R38.2@35.432,92.965 ; R38.2@35.433,92.964 Q9.3@38.405,92.964
NetQ10_3: Q10.3 R49.2 | length 3.5
  Top Layer w0.25: R49.2@35.392,77.902 35.392,78.534 35.852,78.994 Q10.3@38.024,78.994
NetQ11_3: Q11.3 R60.2 | length 3.1
  Top Layer w0.25: R60.2@35.392,62.84 35.494,62.738 Q11.3@38.405,62.738
NetQ12_3: Q12.3 R71.2 | length 3.7
  Top Layer w0.25: R71.2@35.392,47.778 35.392,48.047 35.052,48.387 Q12.3@38.024,48.387
NetQ13_3: Q13.3 R82.2 | length 2.9
  Top Layer w0.25: R82.2@35.392,32.715 35.823,33.147 Q13.3@38.151,33.147
NetQ14_3: Q14.3 R93.2 | length 2.3
  Top Layer w0.25: R93.2@35.392,17.653 35.519,17.526 Q14.3@37.643,17.526
NetR1_2: R1.2 T1.8 | length 6.5
  Bottom Layer w0.25: T1.8@119.612,79.48 119.612,79.131 121.031,77.713 R1.2@121.031,73.598
NetR3_2: R3.2 T1.11 | length 2.4
  Bottom Layer w0.25: R3.2@113.411,77.154 113.502,77.245 113.502,79.39 T1.11@113.593,79.48
NetR27_1: R27.1 R30.1 | length 3.7
  Top Layer w0.25: R30.1@25.534,108.027 R27.1@29.282,108.027
NetR35_2: R35.2 R36.1 | length 3.7
  Top Layer w0.25: R35.2@25.534,115.558 R36.1@29.282,115.558
NetR38_1: R38.1 R41.2 | length 3.7
  Top Layer w0.25: R41.2@25.534,92.965 R38.1@29.282,92.965
NetR46_2: R46.2 R47.1 | length 3.7
  Top Layer w0.25: R46.2@25.534,100.496 R47.1@29.282,100.496
NetR49_1: R49.1 R52.2 | length 3.7
  Top Layer w0.25: R52.2@25.534,77.902 R49.1@29.282,77.902
NetR57_2: R57.2 R58.1 | length 3.7
  Top Layer w0.25: R57.2@25.534,85.434 R58.1@29.282,85.434
NetR60_1: R60.1 R63.2 | length 3.7
  Top Layer w0.25: R63.2@25.534,62.84 R60.1@29.282,62.84
NetR68_2: R68.2 R69.1 | length 3.7
  Top Layer w0.25: R68.2@25.534,70.371 R69.1@29.282,70.371
NetR71_1: R71.1 R74.2 | length 3.7
  Top Layer w0.25: R74.2@25.534,47.778 R71.1@29.282,47.778
NetR79_2: R79.2 R80.1 | length 3.7
  Top Layer w0.25: R79.2@25.534,55.309 R80.1@29.282,55.309
NetR82_1: R82.1 R85.2 | length 3.7
  Top Layer w0.25: R85.2@25.534,32.715 R82.1@29.282,32.715
NetR90_2: R90.2 R91.1 | length 3.7
  Top Layer w0.25: R90.2@25.534,40.247 R91.1@29.282,40.247
NetR93_1: R93.1 R96.2 | length 3.7
  Top Layer w0.25: R96.2@25.534,17.653 R93.1@29.282,17.653
NetR101_2: R101.2 R102.1 | length 3.7
  Top Layer w0.25: R101.2@25.534,25.184 R102.1@29.282,25.184
SCLK:RDTX_IN-: C3.1 D2.1 T1.9 U1.46 | length 53
  Bottom Layer w0.25: U1.46@83.73,58.778 97.004,58.778 102.234,64.008 116.332,64.008 116.568,64.244 C3.1@116.568,65.532 116.568,65.692 118.029,67.153 118.029,74.487 ; D2.1@116.967,74.487 118.029,74.487 ; T1.9@117.606,79.48 117.606,78.228 118.999,76.835 118.999,75.457 118.029,74.487
SI:RDTX_IN+: C1.2 D1.1 T1.7 U1.47 | length 60.6
  Bottom Layer w0.25: U1.47@83.73,58.278 97.14,58.278 100.838,61.976 109.22,61.976 110.236,62.992 122.047,62.992 123.444,64.389 C1.2@123.444,65.659 123.646,65.861 123.646,66.623 124.968,67.945 124.968,74.041 124.395,74.614 123.825,74.614 123.7,74.614 123.825,74.739 123.825,78.613 122.958,79.48 T1.7@121.619,79.48
VCOM: C19.2 R4.2 U1.43 U2.9 | length 63.1
  Top Layer w0.25: v1(93.853,60.278) 94.996,59.135 94.996,55.372 97.917,52.451 v1(110.109,52.451)
  Bottom Layer w0.25: U1.43@83.73,60.278 86.948,60.278 v1(93.853,60.278) ; U2.9@108.331,54.438 110.535,54.438 111.887,53.086 111.887,52.324 ; v1(110.109,52.451) 111.76,52.451 111.887,52.324 ; R4.2@123.317,39.054 123.39,39.054 123.611,39.275 123.611,39.348 124.714,40.451 124.714,45.72 121.049,49.385 C19.2@111.887,49.385 111.887,52.324
pads on no net: J1. J2. J3. J4. J4.2 T1.2 T1.5 U1.40 U1.42 U1.61 U1.62 U2.1 U2.7 U2.8 U2.12 U2.14 U2.15

## Polygon pours and split planes (outlines as drawn)
BAT_NEG on GND Layer (split plane): 106.807,78.105 125.49,78.105 125.49,8.001 117.983,8.001 117.983,0.51 8,0.51 8,8 0.51,8 0.51,125.476 7.492,125.476 7.492,132.49 106.807,132.49
BAT_NEG on VCC Layer (split plane): 106.807,78.105 125.49,78.105 125.49,8.001 118,8.001 118,0.51 8.001,0.51 8.001,8 0.51,8 0.51,125.349 7.493,125.349 7.493,132.49 106.807,132.49

## Other copper
GND Layer (plane layer: these items are gaps in the copper):
  rectangle: 0,0 8,8
  rectangle: 117.983,0 126.11,8.001
  rectangle: -0.508,125.476 7.492,133.476
  rectangle: 106.807,78.105 125.603,132.588
VCC Layer (plane layer: these items are gaps in the copper):
  rectangle: 106.807,78.105 125.603,132.588
  rectangle: -0.507,125.349 7.493,133.349
  rectangle: 118,0 126,8.001
  rectangle: 0.001,0 8.001,8

## Silkscreen, mask and mechanical layers (free items; w line width, h text height)
Top Overlay:
  drawing of 9 lines, arcs and shapes, not listed
  text "CAUTION: UP TO 60 V DC" at 72.136,125.501 h3
  text "BMS SLAVE 14S · MC33771C" at 89.027,16.141 h1.5
Board:
  the board outline again, w0.254